# Altium PCB PCB1.PcbDoc
Units mm, origin at the board's own origin, x right, y up, seen from the top; angles counter-clockwise.
Board outline 91 x 71 mm, 2 copper layers (Top Layer, Bottom Layer); 33 components, 34 nets, 227 pads, 246 vias.
Unrouted connection lines stored in the file: 23.
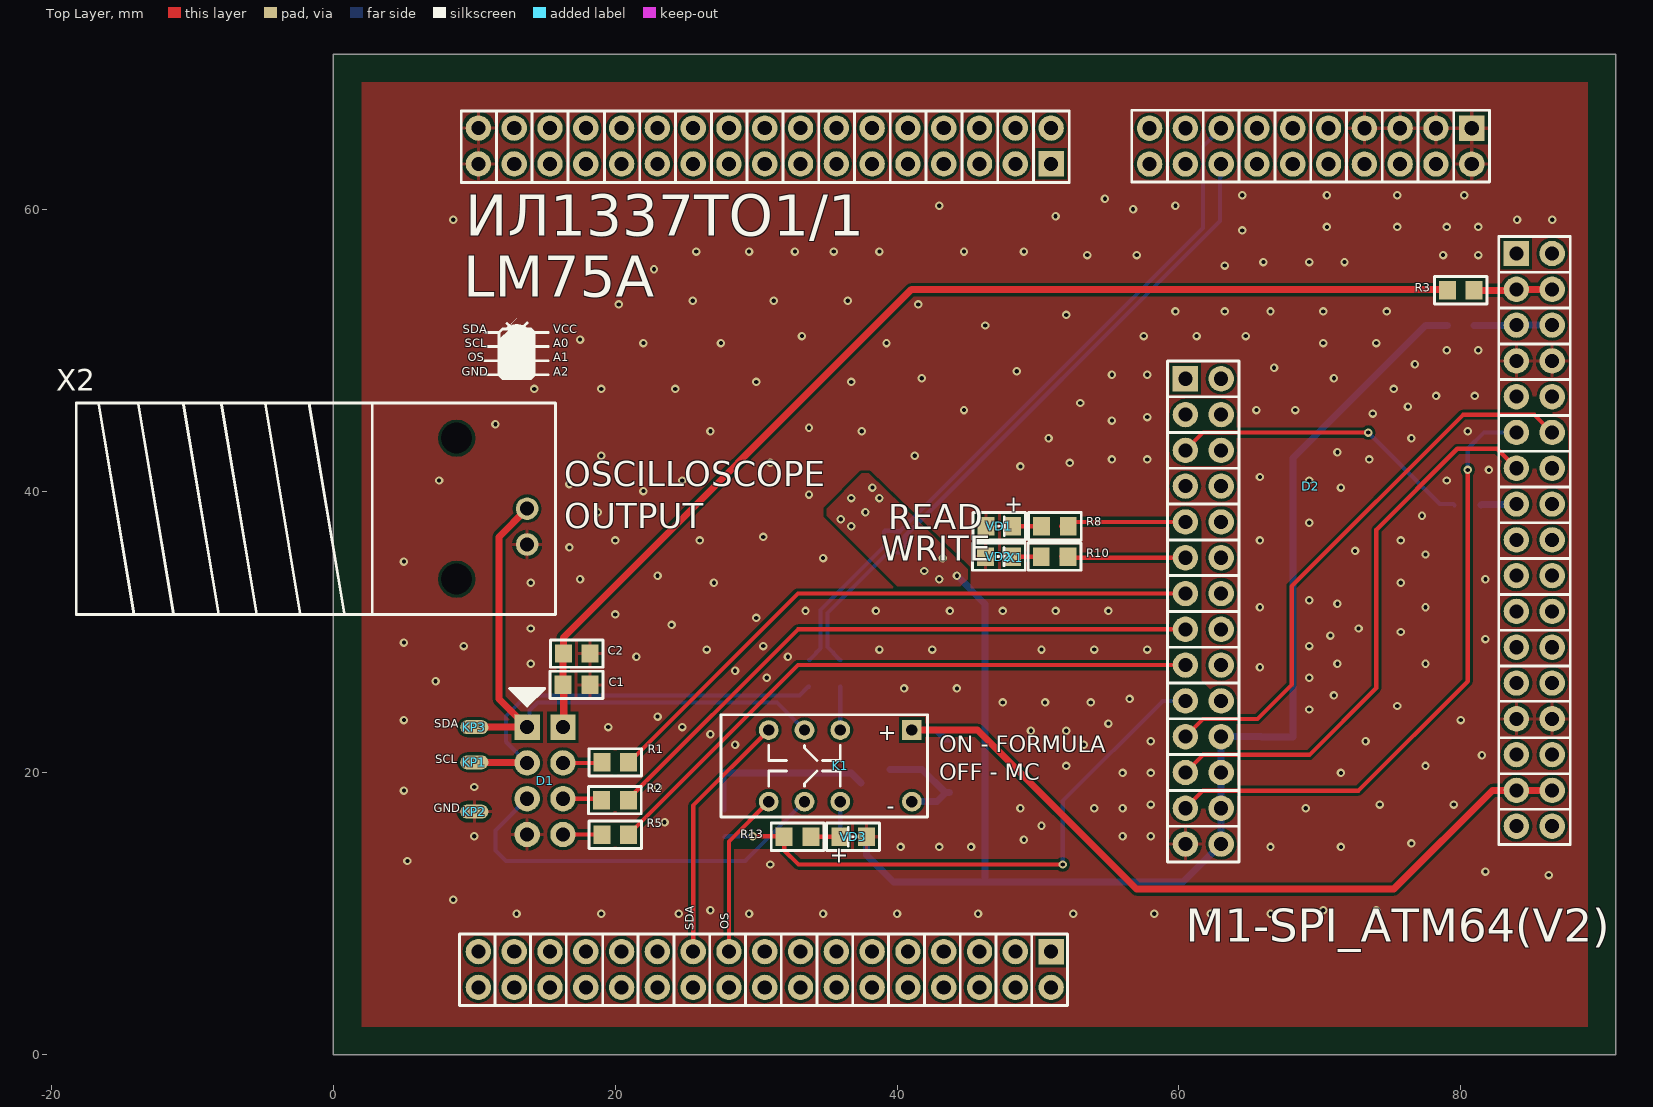
[diagram p0: Top Layer view]
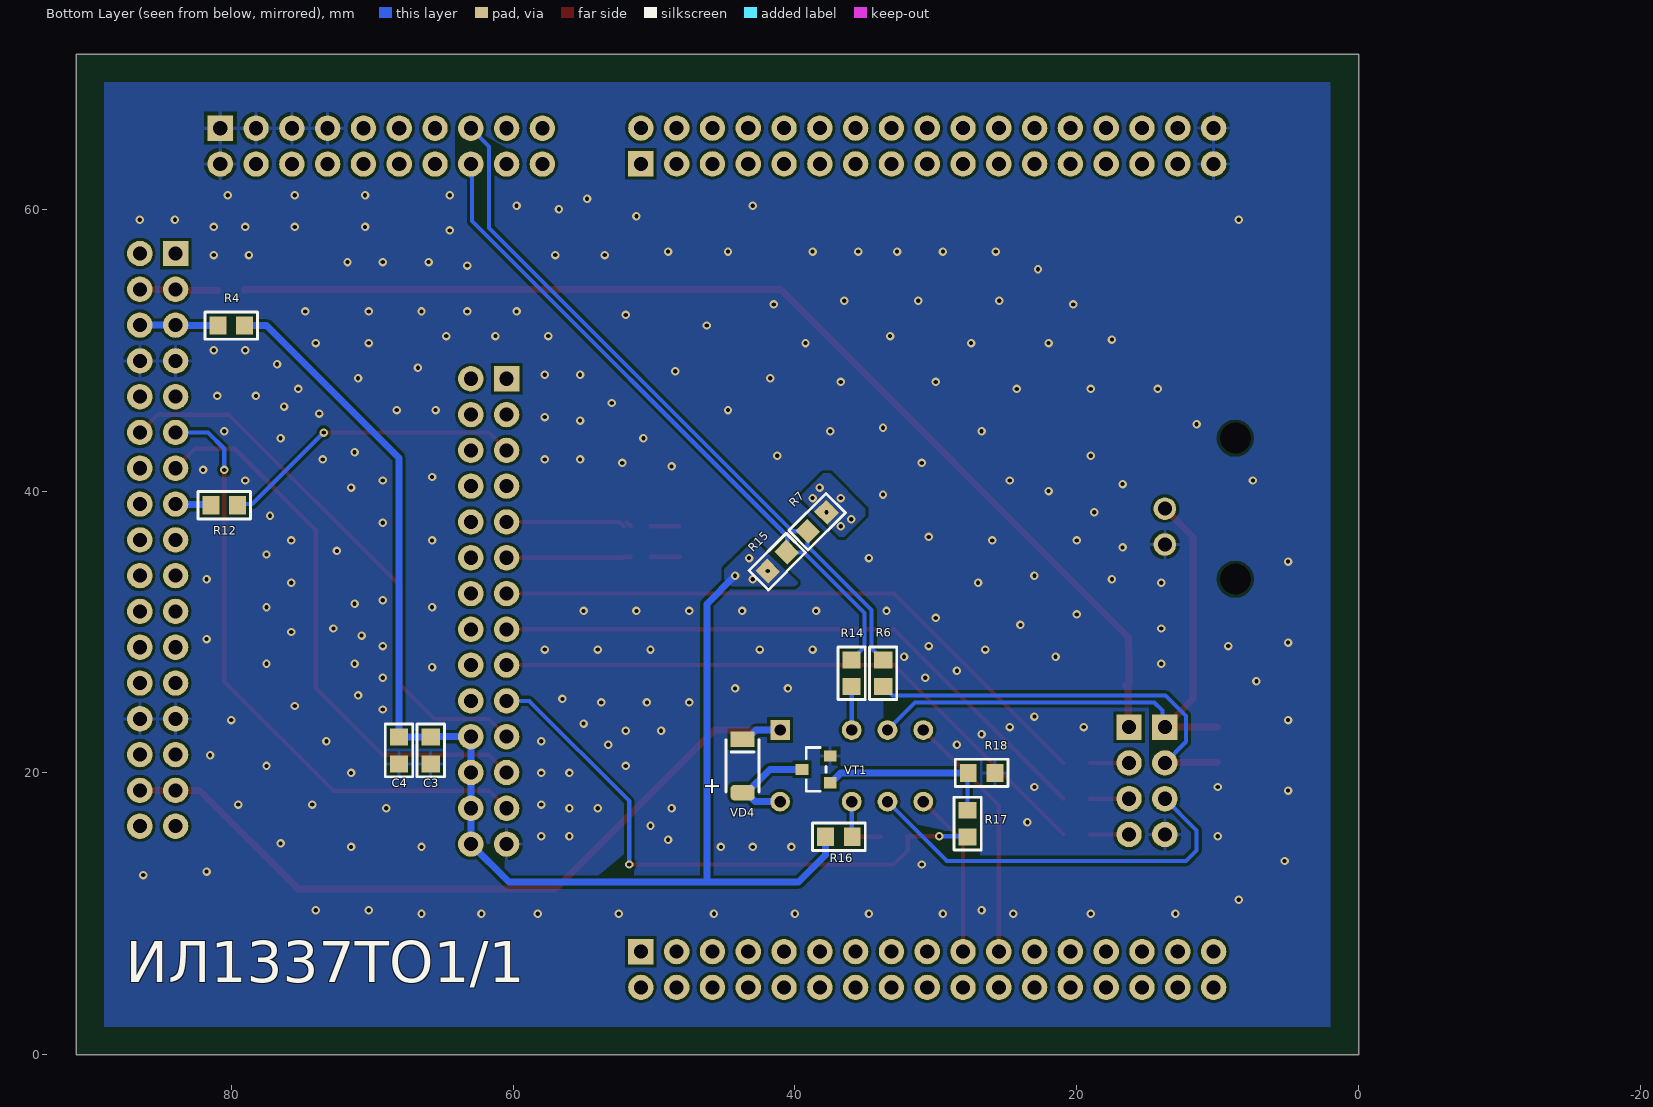
[diagram p1: Bottom Layer view, seen from below]

## Layer stack, top to bottom
Top Solder: solder mask 0.0102, Solder Resist, Dk 3.5
Top Layer: signal copper 0.0356
Dielectric 1: dielectric 0.32, FR-4, Dk 4.8
Bottom Layer: signal copper 0.0356
Bottom Solder: solder mask 0.0102, Solder Resist, Dk 3.5

## Board outline
0,0 91,0 91,71 0,71

## Design rules (kind name [scope] priority, off if disabled: settings)
Clearance [All] p1: gap=0.2 ignorepadtopadclearanceinfootprint=FALSE
ComponentClearance [All] p1: gap=0 collisioncheckmode=3 verticalgap=0 showdistances=FALSE
PolygonConnect [InNet('GND')] p1: thpad.connectstyle=Relief thpad.reliefconductorwidth=0.254 thpad.reliefentries=4 thpad.polygonreliefangle="90 Angle" thpad.airgapwidth=0.254 smdpad.connectstyle=Relief smdpad.reliefconductorwidth=0.254 smdpad.reliefentries=4 smdpad.polygonreliefangle="90 Angle" smdpad.airgapwidth=0.254 via.connectstyle=Direct via.reliefconductorwidth=0.254 via.reliefentries=4 via.polygonreliefangle="90 Angle" via.airgapwidth=0.254
RoutingVias [All] p1: holewidth=0.6 width=1.2 viastyle="Through Hole" minholewidth=0.3 minwidth=0.6 maxholewidth=1.2 maxwidth=2.4
SilkToSilkClearance [All] p1: silktosilkclearance=0
SilkToSolderMaskClearance [IsPad] p1: minsilkscreentomaskgap=0 clearancetoexposedcopper=TRUE
SolderMaskExpansion [All] p1: expansion=0.102 istentingtop=FALSE
Width [All] p1: maxlimit=0.6 minlimit=0.2 preferedwidth=0.3
27 further rules are at their usual default settings.

## Components (designator, comment, footprint, x,y, rotation, side; value= is the part's Value field where it differs from the comment)
C1 "0.1uF" 0805 17.25,26.25 r0 top
C2 "47uF" 0805 17.27,28.471 r0 top
C3 "0.1uF" 0805 65.846,21.596 r270 bottom
C4 "47uF" 0805 68.096,21.596 r270 bottom
D1 "LM75" LM75 13.75,23.25 r0 top
D2 "M1-SPI-ATM64(V2)" M1-SPI-ATM64(V2) 69.35,40.35 r270 top locked
K1 "V23079A1001B301 TE" V23079A1001B301 34.75,20.5 r180 top
KP1 "Contact" Contact 10,20.75 r180 top
KP2 "Contact" Contact 10,17.25 r180 top
KP3 "Contact" Contact 10,23.25 r180 top
R1 "100" 0805 20,20.75 r0 top
R2 "100" 0805 19.98,18.067 r0 top
R3 "1" 0805 80,54.25 r180 top
R4 "1" 0805 80,51.75 r180 bottom
R5 "100" 0805 20,15.609 r0 top
R6 "100" 0805 33.742,27.071 r90 bottom
R7 "10k" 0805 38.426,37.829 r135 bottom
R8 "2.2k" 0805 51.2,37.5 r180 top
R10 "2.2k" 0805 51.18,35.348 r180 top
R12 "100" 0805 80.5,39 r0 bottom
R13 "2.2k" 0805 32.937,15.47 r0 top
R14 "100" 0805 35.979,27.071 r90 bottom
R15 "10k" 0805 41.25,35 r315 bottom
R16 "10k" 0805 36.88,15.47 r0 bottom
R17 "4.7k" 0805 27.75,16.4 r90 bottom
R18 "20k" 0805 26.75,20 r180 bottom
VD1 "LED(0805)" 0805(LED) 47.25,37.5 r180 top
VD2 "LED(0805)" 0805(LED) 47.23,35.348 r180 top
VD3 "LED(0805)" 0805(LED) 36.88,15.47 r0 top
VD4 "LL4148 NXP" SOD80C 43.714,20.5 r90 bottom
VT1 "MMBT5551L" SOT-23 38.5,20.25 r90 bottom
X1 "FORMULA" FORMULA 38.75,34 r0 top locked
X2 "BNC-JR" BNC-JR 8.75,38.75 r0 top

## Footprints (in the part's own frame and the unit in brackets; to place one, negate y for a bottom-side part, rotate by r counter-clockwise, add the part's x,y. Pads: shape width x height; smd on the part's side, far side on the other; paste and mask are expansions set on the pad)
0805 [mm]
  rect 1.2x1.3 smd: 1(-0.95,0) 2(0.95,0)
  silkscreen extent -1.87,-0.97 1.87,0.97, body extent -1.05,-0.63 0.95,0.63, height 0.55
0805(LED) [mm]
  rect 1.2x1.3 smd: 1(-0.95,0) 2(0.95,0)
  silkscreen extent -1.87,-0.97 1.87,0.97, body extent -1.03,-0.41 1.03,0.5, height 0.85
BNC-JR [mm]
  round 1.6 hole 1: 1(5,0) 2(5,-2.54)
  round 0 hole 2.2: ""(0,-5) ""(0,5)
  silkscreen extent -27,-7.5 7,7.5, body extent -28.7,-7.38 6.9,7.38, height 15.6
Contact [mm]
  oval 2x1 smd: 1(0,0)
FORMULA [mm]
  rect 1.8x1.8 hole 1: 1(12.18,29.22) VDDF(12.18,-26.68) VEEF(45.2,22.86)
  round 1.8 hole 1: 2(9.64,29.22) 3(7.1,29.22) 4(4.56,29.22) 5(2.02,29.22) 6(-0.52,29.22) 7(-3.06,29.22) 8(-5.6,29.22) 9(-8.14,29.22) 10(-10.68,29.22) 11(-13.22,29.22) 12(-15.76,29.22) 13(-18.3,29.22) 14(-20.84,29.22) 15(-23.38,29.22) 16(-25.92,29.22) 17(12.18,31.76) 18(9.64,31.76) 19(7.1,31.76) 20(4.56,31.76) 21(2.02,31.76) 22(-0.52,31.76) 23(-3.06,31.76) 24(-5.6,31.76) 25(-8.14,31.76) 26(-10.68,31.76) 27(-13.22,31.76) 28(-15.76,31.76) 29(-18.3,31.76) 30(-20.84,31.76) 31(-23.38,31.76) 32(-25.92,31.76) 33(-28.46,-29.22) 34(-25.92,-29.22) 35(-23.38,-29.22) 36(-20.84,-29.22) 37(-18.3,-29.22) 38(-15.76,-29.22) 39(-13.22,-29.22) 40(-10.68,-29.22) 41(-8.14,-29.22) 42(-5.6,-29.22) 43(-3.06,-29.22) 44(-0.52,-29.22) 45(2.02,-29.22) 46(4.56,-29.22) 47(7.1,-29.22) 48(9.64,-29.22) 49(-28.46,-26.68) 50(-25.92,-26.68) 51(-23.38,-26.68) 52(-20.84,-26.68) 53(-18.3,-26.68) 54(-15.76,-26.68) 55(-13.22,-26.68) 56(-10.68,-26.68) 57(-8.14,-26.68) 58(-5.6,-26.68) 59(-3.06,-26.68) 60(-0.52,-26.68) 61(2.02,-26.68) 62(4.56,-26.68) 63(7.1,-26.68) 64(9.64,-26.68) +5V(45.2,-15.24) +5V(47.74,-15.24) +5V_VCCF(45.2,20.32) +5V_VCCS(47.74,20.32) +5V_VDDF(45.2,17.78) +5V_VDDS(47.74,17.78) +12V(45.2,-12.7) +12V(47.74,-12.7) -12V(45.2,-17.78) -12V(47.74,-17.78) GND(-28.46,29.22) GND(-28.46,31.76) GND(45.2,-10.16) GND(45.2,15.24) GND(47.74,-10.16) GND(47.74,15.24) IN-OUT1(47.74,10.16) IN-OUT2(47.74,7.62) IN-OUT3(47.74,5.08) IN-OUT4(47.74,2.54) IN-OUT5(47.74,0) IN-OUT6(47.74,-2.54) IN-OUT7(47.74,-5.08) IN-OUT8(47.74,-7.62) NC(45.2,12.7) NC(47.74,12.7) OUT1(45.2,10.16) OUT2(45.2,7.62) OUT3(45.2,5.08) OUT4(45.2,2.54) OUT5(45.2,0) OUT6(45.2,-2.54) OUT7(45.2,-5.08) OUT8(45.2,-7.62) VDDS(12.18,-29.22) VEES(47.74,22.86)
  silkscreen extent -29.8,-30.51 49.02,32.97, body extent -29.79,-30.4 48.98,32.92, height 2.5
LM75 [mm]
  rect 1.8x1.8 hole 1: 1(0,0) 8(2.54,0)
  round 1.8 hole 1: 2(0,-2.54) 3(0,-5.08) 4(0,-7.62) 5(2.54,-7.62) 6(2.54,-5.08) 7(2.54,-2.54)
  body extent -1.28,-8.95 3.81,1.2, height 8.6
M1-SPI-ATM64(V2) [mm]
  rect 1.8x1.8 hole 1: 1X2(-25.4,11.43) 1X3(-7.62,-8.89)
  round 1.8 hole 1: 2X2(-22.86,11.43) 2X3(-7.62,-6.35) 3X2(-25.4,8.89) 3X3(-5.08,-8.89) 4X2(-22.86,8.89) 4X3(-5.08,-6.35) 5X2(-25.4,6.35) 5X3(-2.54,-8.89) 6X2(-22.86,6.35) 6X3(-2.54,-6.35) 7X2(-25.4,3.81) 7X3(0,-8.89) 8X2(-22.86,3.81) 8X3(0,-6.35) 9X2(-25.4,1.27) 9X3(2.54,-8.89) 10X2(-22.86,1.27) 10X3(2.54,-6.35) 11X2(-25.4,-1.27) 11X3(5.08,-8.89) 12X2(-22.86,-1.27) 12X3(5.08,-6.35) 13X2(-25.4,-3.81) 13X3(7.62,-8.89) 14X2(-22.86,-3.81) 14X3(7.62,-6.35) 15X2(-25.4,-6.35) 15X3(10.16,-8.89) 16X2(-22.86,-6.35) 16X3(10.16,-6.35) 17X2(-25.4,-8.89) 17X3(12.7,-8.89) 18X2(-22.86,-8.89) 18X3(12.7,-6.35) 19X2(-25.4,-11.43) 19X3(15.24,-8.89) 20X2(-22.86,-11.43) 20X3(15.24,-6.35) 21X3(17.78,-8.89) 22X3(17.78,-6.35) 23X3(20.32,-8.89) 24X3(20.32,-6.35) 25X3(22.86,-8.89) 26X3(22.86,-6.35) 27X3(25.4,-8.89) 28X3(25.4,-6.35)
  silkscreen extent -26.67,-12.7 26.67,12.7
SOD80C [mm]
  rrect50% 1.1x1.7 smd: 1(-1.9,0)
  rect 1.1x1.7 smd: 2(1.9,0)
  silkscreen extent -1.85,-1.17 1.85,1.17, body extent -1.9,-0.8 1.8,0.8, height 1.55
SOT-23 [mm]
  rect 0.8x0.9 smd: 1(-0.95,-1) 1(-0.95,-1) 2(0.95,-1) 2(0.95,-1) 3(0,1) 3(0,1)
  silkscreen extent -1.55,-0.72 1.55,0.7, body extent -1.5,-1.25 1.5,1.25, height 1.05
V23079A1001B301 [mm]
  rect 1.4x1.4 hole 0.8: 1(-6.3,-2.54)
  round 1.4 hole 0.8: 3(-1.22,-2.54) 4(1.32,-2.54) 5(3.86,-2.54) 8(3.86,2.54) 9(1.32,2.54) 10(-1.22,2.54) 12(-6.3,2.54)
  silkscreen extent -7.4,-3.63 7.25,3.63, body extent -7.25,-3.6 7.25,3.6, height 10.4

## Part data
C1 C2 C3 C4: library part C0805, ComponentHeigt=1.3, Firme=AVX, KIND=Конденсатор, Leadform=SMD, Packaging=0805
R1 R2 R3 R4 R5 R6 R7 R8 R10 R12 R13 R14 R15 R16 R17 R18: library part "R0805 Yageo", ComponentHeigt=0.6, Firme=Yageo, KIND=Резистор, Leadform=SMD, Packaging=0805
D2: ComponentHeigt=5.5, Name=Вилка, Specification="Вилка PLD2-2 *", Typ=PLD2-2
VD1 VD2 VD3: ComponentHeigt=0.75, Firme=Kingbright, KIND="Светодиод L-1154GD Kingbright", Leadform="в отверстия", NN=24003000
VD4: Component Link=http://www.nxp.com, ComponentHeigt=1.6, Firme=NXP, KIND="Диод LL4148 NXP", Leadform=SMD, NN=24009301, Packaging=SOD-80C
VT1: ComponentHeigt=1.1, Firme=ONS, KIND="Транзистор MMBT5551L*G ONS", Leadform=SMD, NN=24007468, Packaging=SOT-23

## Via types
v1: diameter 0.6, hole 0.3, Top Layer to Bottom Layer, tented both sides, 246 vias

## Nets (pads, with @x,y where several pads share a name; then routed paths per layer and width w, separated by ;. In a path a pad name is that pad's centre, name@x,y a point inside that pad or via, vN(x,y) a via of type N, cw(c..) or ccw(c..) an arc to the next point about the centre after c; other vN are vias at no path point)
+5V_CONST: K1.1 VD4.2 X1.+5V | length 55.9
  Top Layer w0.5: K1.1 45.71,23.04 57,11.75 75.25,11.75 82.26,18.76 83.95,18.76 X1.+5V@86.49,18.76
  Bottom Layer w0.5: K1.1 42.774,23.04 43.414,22.4 VD4.2
+5V_VCC: R3.1 X1.+5V_VCCF X1.+5V_VCCS | length 5.6
  Top Layer w0.5: R3.1 83.95,54.25 X1.+5V_VCCF X1.+5V_VCCS
+5V_VDD: R4.1 X1.+5V_VDDF X1.+5V_VDDS | length 5.6
  Bottom Layer w0.5: R4.1 83.95,51.75 X1.+5V_VDDF X1.+5V_VDDS
A0_LM: D1.7 R1.1 | length 2.8
  Top Layer w0.3: D1.7 R1.1@19.05,20.71
A1_LM: D1.6 R2.1 | length 2.8
  Top Layer w0.3: D1.6 R2.1@19.05,18.17
A2_LM: D1.5 R5.1 | length 2.8
  Top Layer w0.3: D1.5 R5.1@19.05,15.63
ADDR0: D2.13X3 R1.2 | length 44.5
  Top Layer w0.3: R1.2@20.95,20.71 32.97,32.73 D2.13X3
ADDR1: D2.15X3 R2.2 | length 44.5
  Top Layer w0.3: R2.2@20.95,18.17 32.97,30.19 D2.15X3
ADDR2: D2.17X3 R5.2 | length 44.5
  Top Layer w0.3: R5.2@20.95,15.63 32.97,27.65 D2.17X3
DI1_MC: D2.21X3 X1.IN-OUT1 | length 40.1
  Top Layer w0.3: D2.21X3 61.713,23.823 65.573,23.823 68,26.25 68,33.25 80.16,45.41 85.24,45.41 X1.IN-OUT1
DO1_MC: D2.25X3 X1.OUT1 | length 44.2
  Top Layer w0.3: D2.25X3 61.71,18.74 72.74,18.74 80.5,26.5 v1(80.5,41.5)
  Bottom Layer w0.3: v1(80.5,41.5) 80.5,43 81.66,44.16 X1.OUT1
DO2_MC: D2.23X3 X1.OUT2 | length 40.2
  Top Layer w0.3: D2.23X3 61.712,21.282 69.26,21.282 74,26.021 74,37.25 79.75,43 82.57,43 X1.OUT2
GND: C1.2 C2.2 C3.2 C4.2 D1.4 D2.1X2 D2.2X2 D2.3X2 D2.5X2 D2.7X2 D2.27X3 KP2.1 R18.2 VD1.2 VD2.2 VD3.2 VT1.2 X1.GND X2.2
  other v1: 13,10 19,10 24.5,10 29.5,10 34.75,10 40,10 45.75,10 52.5,10 58.25,10 62.25,10 66.5,10 26.75,10.25 70.25,10.25 74,10.25 8.5,11 86.25,12.75 81.75,13 31,13.5 5.25,13.75 40.25,14.75 43,14.75 45.25,14.75 66.5,14.75 71.5,14.75 76.5,15 49,15.25 10,15.5 56,15.5 58,15.5 50.25,16.25 23.5,16.5 48.75,17.5 54,17.5 56,17.5 69,17.5 58,17.75 74.25,17.75 79.5,17.75 5,18.75 10,19 23,19 56,20 58,20 71.5,20 52,20.5 77.5,20.5 81.5,21.25 28.5,22 53.25,22 58,22.25 73.25,22.25 26.75,22.75 49.5,23 52,23 19.5,23.25 24.75,23.25 55,23.5 5,23.75 80,23.75 23,24 69.25,24.5 75.5,24.75 47.5,25 50.5,25 53.75,25 56.5,25.25 71,25.5 40.5,26 44.25,26 7.25,26.5 30.75,26.75 69.25,26.75 28.5,27.25 65.75,27.5 14,27.75 71.25,27.75 77.5,27.75 21.5,28.25 32.25,28.25 26.5,28.75 38.75,28.75 42.5,28.75 50.25,28.75 54,28.75 57.75,28.75 9.25,29 30.5,29 69.25,29 5,29.25 81.75,29.5 70.75,29.75 75.75,30 14,30.25 72.75,30.25 24,30.5 30,31 20,31.25 33.5,31.5 38.5,31.5 43.75,31.5 47.5,31.5 51.25,31.5 55,31.5 65.75,31.75 77.5,31.75 71.25,32 69.25,32.25 14,33.5 27,33.5 75.75,33.5 17.5,33.75 81.75,33.75 23,34 5,35 34.75,35.25 77.5,35.5 72.5,35.75 16.75,36 20,36.5 26,36.5 65.75,36.5 75.75,36.5 30.5,36.75 69.25,37.75 77.25,38.25 18.75,38.5 33.75,39.75 22,40 71.5,40.25 16.75,40.5 7.5,40.75 24.75,40.75 69.25,40.75 79,40.75 65.75,41 82,41.5 48.75,41.75 31,42 52.25,42 55.25,42.25 57.75,42.25 73.5,42.25 19,42.5 41.25,42.5 71.25,42.75 50.75,43.75 76.5,43.75 26.75,44.25 37.5,44.25 80.5,44.25 33.75,44.5 11.5,44.75 55.25,45 57.75,45.25 73.75,45.5 44.75,45.75 65.5,45.75 68.25,45.75 76.25,46 53,46.25 78.25,46.75 81,46.75 14.25,47.25 19,47.25 24.25,47.25 75.25,47.25 30,47.75 36.75,47.75 41.75,48 71,48 55.25,48.25 57.75,48.25 48.5,48.5 66.75,48.75 76.75,49 79,50 81.25,50 22,50.5 27.5,50.5 39.25,50.5 70.25,50.5 74,50.5 17.5,50.75 33.25,51 57.5,51 61.25,51 64.75,51 46.25,51.75 52,52.5 59.75,52.75 63.25,52.75 66.5,52.75 70.25,52.75 74.75,52.75 20.25,53.25 41.5,53.25 25.5,53.5 31.25,53.5 36.5,53.5 22.75,55.75 63.25,56 66,56.25 69.25,56.25 71.75,56.25 53.5,56.75 57,56.75 78.75,56.75 81.25,56.75 25.75,57 29.5,57 32.75,57 35.5,57 38.75,57 44.75,57 49,57 64.5,58.5 70.5,58.75 75.5,58.75 79,58.75 81.25,58.75 8.5,59.25 84,59.25 86.5,59.25 51.25,59.5 56.75,60 43,60.25 59.75,60.25 54.75,60.75 64.5,61 70.5,61 75.5,61 80.25,61
LED_READ: D2.9X3 R8.1 | length 8.9
  Top Layer w0.3: R8.1@51.65,37.5 R8.1@51.96,37.81 ; R8.1 52.46,37.81 D2.9X3
LED_WRITE: D2.11X3 R10.1 | length 8.9
  Top Layer w0.3: R10.1@51.63,35.348 R10.1 52.208,35.27 D2.11X3
NetK1_3: K1.3 R14.1 | length 3.1
  Bottom Layer w0.3: K1.3 35.97,26.111 R14.1
NetK1_10: K1.10 R16.1 | length 2.5
  Bottom Layer w0.3: K1.10 35.97,15.48 R16.1@36,15.45
NetK1_12: K1.12 VD4.1 VT1.3 | length 7.8
  Bottom Layer w0.5: VT1.3@39.5,20.25 41.764,20.25 43.414,18.6 VD4.1 43.478,18.6 42.838,17.96 K1.12
NetR8_2: R8.2 VD1.1 | length 2
  Top Layer w0.3: VD1.1 R8.2
NetR10_2: R10.2 VD2.1 | length 2
  Top Layer w0.3: VD2.1 R10.2
NetR13_2: R13.2 VD3.1 | length 2
  Top Layer w0.3: R13.2 VD3.1
NetR17_2: R17.2 R18.1 VT1.1 | length 13
  Bottom Layer w0.3: R18.1 27.75,19.95 R17.2 ; VT1.1@37.3,19.5 37.5,19.3 VT1.1@37.45,19.3
  Bottom Layer w0.5: R18.1 36.75,20 VT1.1@37.45,19.3
OS_F: K1.8 X1.56 | length 11.8
  Top Layer w0.3: X1.56 28.07,15.14 K1.8
OS_LM: D1.3 K1.9 | length 28.6
  Bottom Layer w0.3: D1.3 11.5,15.92 11.5,14.5 12.25,13.75 29.22,13.75 K1.9
RELE1: D2.19X3 R13.1 R17.1 | length 41.6
  Top Layer w0.3: v1(29.75,15.5) 31.957,15.5 R13.1 31.987,14.513 33,13.5 v1(51.75,13.5)
  Bottom Layer w0.3: R17.1 27.8,15.5 v1(29.75,15.5) ; v1(51.75,13.5) 51.75,18 58.86,25.11 D2.19X3
RST_IN: R12.2 X1.OUT3 | length 2.5
  Bottom Layer w0.5: R12.2 81.49,39.04 83.91,39.04 X1.OUT3
RST_MC: D2.5X3 R12.1 | length 21.7
  Top Layer w0.3: D2.5X3 61.721,44.151 v1(73.438,44.151)
  Bottom Layer w0.3: v1(73.438,44.151) 78.515,39.074 79.476,39.074 R12.1
SCL_LM: D1.2 KP1.1 R6.1 | length 30.2
  Top Layer w0.5: KP1.1 13.79,20.75 D1.2
  Bottom Layer w0.3: D1.2 12.25,22.21 12.25,24.045 13.705,25.5 33.071,25.5 33.692,26.121 R6.1
SCL_MC: D2.15X2 R6.2 R7.1 | length 50.6
  Bottom Layer w0.3: R6.2 33.792,28.021 34.242,28.471 34.242,28.521 34.563,28.842 34.563,31.563 39.098,36.098 39.098,36.451 39.062,36.486 39.062,37.122 39.133,37.193 39.769,37.193 39.805,37.158 40.201,37.158 61.71,58.667 61.71,64.46 D2.15X2
SDA_F: K1.5 X1.55 | length 17.9
  Top Layer w0.3: X1.55 25.53,17.68 K1.5
SDA_LM: D1.1 K1.4 KP3.1 X2.1 | length 42.7
  Top Layer w0.5: KP3.1 D1.1 13.5,23.5 11.75,25.25 11.75,36.75 X2.1
  Bottom Layer w0.3: D1.1 13.924,23.424 13.924,24.424 14.5,25 31.47,25 K1.4
SDA_MC: D2.16X2 R14.2 R15.1 | length 47.9
  Bottom Layer w0.3: R14.2 35.929,28.021 35.479,28.471 35.479,28.521 35.063,28.936 35.063,31.356 39.344,35.636 40.543,35.636 40.614,35.707 40.614,36.344 40.543,36.414 40.543,36.793 62.913,59.163 62.913,62.257 ccw(c62.7,62.468) 63,62.468 D2.16X2
VCC_LM: C1.1 C2.1 D1.8 R3.2 | length 79.7
  Top Layer w0.5: C1.1 C2.1@16.3,28.451 ; C2.1 16.32,29.613 41.007,54.3 79.05,54.3 R3.2 ; D1.8@16.494,23.454 D1.8 16.346,23.9 16.346,25.85 C1.1@16.55,26.25
VCC_MC: C3.1 C4.1 D2.22X3 D2.24X3 D2.26X3 D2.28X3 R4.2 R7.2 R15.2 R16.2 | length 98.4
  Top Layer w0.5: D2.26X3 D2.26X3@63.005,17.495
  Bottom Layer w0.5: R16.2 37.83,14.17 39.75,12.25 46.25,12.25 ; v1(44.25,34) 46.25,32 46.25,12.25 ; D2.26X3@63.005,17.495 D2.26X3 ; R4.2 77.5,51.75 68.096,42.346 C4.1 C3.1 65.846,22.57 D2.22X3 D2.24X3 D2.26X3 ; 46.25,12.25 60.3,12.25 D2.28X3 D2.26X3
  other v1: 43,33.75 41.922,34.328 43.25,35.25 36.75,37.5 36,38 37.754,38.501 36.75,39.5 38.75,39.5 38.25,40.25
pads on no net: D2.1X3 D2.2X3 D2.3X3 D2.4X2 D2.4X3 D2.6X2 D2.6X3 D2.7X3 D2.8X2 D2.8X3 D2.9X2 D2.10X2 D2.10X3 D2.11X2 D2.12X2 D2.12X3 D2.13X2 D2.14X2 D2.14X3 D2.16X3 D2.17X2 D2.18X2 D2.18X3 D2.19X2 D2.20X2 D2.20X3 X1.1 X1.2 X1.3 X1.4 X1.5 X1.6 X1.7 X1.8 X1.9 X1.10 X1.11 X1.12 X1.13 X1.14 X1.15 X1.16 X1.17 X1.18 X1.19 X1.20 X1.21 X1.22 X1.23 X1.24 X1.25 X1.26 X1.27 X1.28 X1.29 X1.30 X1.31 X1.32 X1.33 X1.34 X1.35 X1.36 X1.37 X1.38 X1.39 X1.40 X1.41 X1.42 X1.43 X1.44 X1.45 X1.46 X1.47 X1.48 X1.49 X1.50 X1.51 X1.52 X1.53 X1.54 X1.57 X1.58 X1.59 X1.60 X1.61 X1.62 X1.63 X1.64 X1.+12V X1.-12V X1.IN-OUT2 X1.IN-OUT3 X1.IN-OUT4 X1.IN-OUT5 X1.IN-OUT6 X1.IN-OUT7 X1.IN-OUT8 X1.NC X1.OUT4 X1.OUT5 X1.OUT6 X1.OUT7 X1.OUT8 X1.VDDF X1.VDDS X1.VEEF X1.VEES X2.

## Polygon pours and split planes (outlines as drawn)
VCC_MC on Top Layer "NONET_L-01_P-001" (solid, remove dead copper, pour order 0): 35,38.75 35,38.25 40,33.25 44.5,33.25 45,33.75 45,34.47 38,41.25 37.5,41.25
GND on Top Layer "NONET_L-01_P-001" (solid, remove dead copper, pour order 3): 2,69 2,2 89,2 89,69
VCC_MC on Bottom Layer "NONET_L-01_P-001" (solid, remove dead copper, pour order 2): 42.904,36.507 45,34.47 45,33.75 44.5,33.25 40,33.25 39.75,33.5
VCC_MC on Bottom Layer "NONET_L-01_P-001" (solid, remove dead copper, pour order 1): 36.5,36.75 35,38.25 35,38.75 37.5,41.25 38,41.25 39.5,39.75 39.5,39.403 36.847,36.75
GND on Bottom Layer "NONET_L-01_P-001" (solid, remove dead copper, pour order 4): 2,69 2,2 89,2 89,69

## Other copper
Top Layer:
  pour cut-out: 31.798,17.96 31.798,15.921 30.424,15.921
  pour cut-out: 45.187,34.551 45.187,32.75 45,32.75
  pour cut-out: 79.85,55.1 79.85,53.4 80.15,53.4 80.15,55.1
  pour cut-out: 31.969,14.62 28.07,14.62 28.07,15.27
  pour cut-out: 31.576,16.32 29.271,16.32 29.271,15.523
  pour cut-out: 83.95,46.7 86.49,46.7 86.49,44.16
  pour cut-out: 82.841,46.7 82.841,45.25 84.25,45.25
  pour cut-out: 87.6,44.16 87.6,41.62 86.49,41.62
  pour cut-out: 84.708,41.62 86,41.62 86,42.142
  pour cut-out: 19.85,19.02 19.85,17.32 20.15,17.32 20.15,19.02
  pour cut-out: 19.85,16.48 19.85,14.78 20.15,14.78 20.15,16.48
  pour cut-out: 19.85,21.56 19.85,19.86 20.15,19.86 20.15,21.56
  pour cut-out: 82.693,45.41 82.693,42.729 83.95,42.729
  pour cut-out: 83.95,43.05 86.49,43.05 86.49,44.16
  pour cut-out: 32.787,16.32 33.087,16.32 33.087,14.62 32.787,14.62
  pour cut-out: 63,25.11 60.46,25.11 60.46,27.65
  pour cut-out: 59.351,25.11 59.351,17.49 64.109,17.49 64.109,25.11
  pour cut-out: 59.351,25.11 59.351,37.81 61.569,37.81 61.569,25.11
  pour cut-out: 64.072,45.717 64.072,42.89 63,42.89
  pour cut-out: 62.974,46.536 60.434,46.536 60.434,45.427
  pour cut-out: 59.351,45.43 59.351,42.89 60.46,42.89
  pour cut-out: 60.46,41.78 63,41.78 63,42.89
  pour cut-out: 51.03,36.198 51.03,34.498 51.33,34.498 51.33,36.198
  pour cut-out: 51.05,38.35 51.05,36.65 51.35,36.65 51.35,38.35
Bottom Layer:
  pour cut-out: 13.75,23.25 14.859,23.25 14.859,20.71
  pour cut-out: 32.892,27.221 36.829,27.221 36.829,25.25 32.892,25.25
  pour cut-out: 33.692,26.121 33.692,24.02 32.45,24.02
  pour cut-out: 79.85,52.6 79.85,50.9 80.15,50.9 80.15,52.6
  pour cut-out: 14.85,24.35 14.85,25 14,25
  pour cut-out: 26.9,15.43 26.9,13.75 28.486,13.75
  pour cut-out: 29.75,16.01 31.91,16.01 31.91,16.44
  pour cut-out: 60.46,64.319 63,64.319 63,65.75
  pour cut-out: 64.109,65.75 64.109,63 62.25,63
  pour cut-out: 60.624,14.95 60.624,11.926 63,14.95
  pour cut-out: 80.35,39.85 80.65,39.85 80.65,38.15 80.35,38.15
  pour cut-out: 51.429,14.775 51.429,12.25 54.5,12.25
  pour cut-out: 36.73,16.32 37.03,16.32 37.03,14.62 36.73,14.62
  pour cut-out: 26.9,16.25 26.9,16.55 28.6,16.55 28.6,16.25

## Silkscreen, mask and mechanical layers (free items; w line width, h text height)
Top Overlay:
  region: 12.5,26 13.75,24.75 15,26
  region: 12.25,51.5 cw(c12.854,50.896) 12.854,51.75 13.146,51.75 cw(c13.146,50.896) 13.75,51.5
  region: 11.75,48.25 11.75,50.75 12.5,51.5 14,51.5 14.25,51.25 14.25,48.25 14,48 12,48
  region: 12.25,51.5 13,52.25
  lines w0.2: 10.75,48.25 11.75,48.25 ; 10.75,49.25 11.75,49.25 ; 10.75,50.25 11.75,50.25 ; 10.75,51.25 11.75,51.25 ; 12.25,51.5 cw(c13,50.5) 13.75,51.5 ; 12.32,51.893 12.517,51.697 ; 13.535,51.708 13.749,51.922 ; 14.25,49.25 15.25,49.25 ; 14.25,50.25 15.25,50.25 ; 15.25,48.25 14.25,48.25 ; 15.25,51.25 14.25,51.25 ; 11.75,48.25 11.812,48.188 11.937,48.063 12,48 14,48 14.25,48.25 ; 11.75,48.25 11.75,51.25 ; 11.75,51.25 12,51.5 14,51.5 14.25,51.25 ; 14.25,48.25 14.25,51.25 ; 12.5,26 15,26 13.75,24.75 12.5,26
  text "ИЛХХХХТО1/1" at -1.578,150.529 h5
  text "ИЛ1337ТО1/1" at 9.339,57.169 h5
  text "LM75A" at 9.21,52.835 h5
  text "SDA" at 9.173,50.984 h1
  text "VCC" at 15.604,50.989 h1
  text "SCL" at 9.332,49.984 h1
  text "A0" at 15.595,49.989 h1
  text "OS" at 9.535,48.984 h1
  text "A1" at 15.595,48.989 h1
  text "A2" at 15.595,47.989 h1
  text "GND" at 9.103,47.984 h1
  text "OSCILLOSCOPE / OUTPUT" at 16.377,36.744 h3
  text "READ" at 39.386,36.702 h3
  text "WRITE" at 38.87,34.452 h3
  text "SDA" at 7.142,22.984 h1
  text "SCL" at 7.222,20.484 h1
  text "ON - FORMULA / OFF - MC" at 43,19.079 h2
  text "GND" at 7.103,16.984 h1
  text "OS" at 28.266,8.893 h1 r90
  text "SDA" at 25.766,8.821 h1 r90
  text "M1-SPI_ATM64(V2)" at 60.5,7.25 h4
Bottom Overlay:
  text "ИЛ1337ТО1/1" at 87.5,4.169 h5
Board:
  the board outline again, w0.2

## Dimensions
91,71 to 91,0 on Mechanical 13
0,71 to 91,71 on Mechanical 13

## Text inside footprints (layer, text, board x,y; h text height)
K1: Top Overlay "-" at 39.82,18.39 h2 r180; Top Overlay "+" at 39.97,23.7 h2 r180
VD1: Top Overlay "+" at 48.95,39.902 h2 r180
VD3: Top Overlay "+" at 35.234,13.236 h2
VD4: Bottom Overlay "+" at 44.966,18.385 h2 r270